# Altium PCB QSTL_THS3491_RGT_G20_RevC.PcbDoc
Units mil, origin at the board's own origin, x right, y up, seen from the top; angles counter-clockwise.
Board outline 1640 x 2700 mil, 4 copper layers (L1 Signal GND, L2 GND, L3 Split Power, L4 GND Thermal), stack 62.449 mil thick; 35 components, 15 nets, 84 pads, 643 vias.
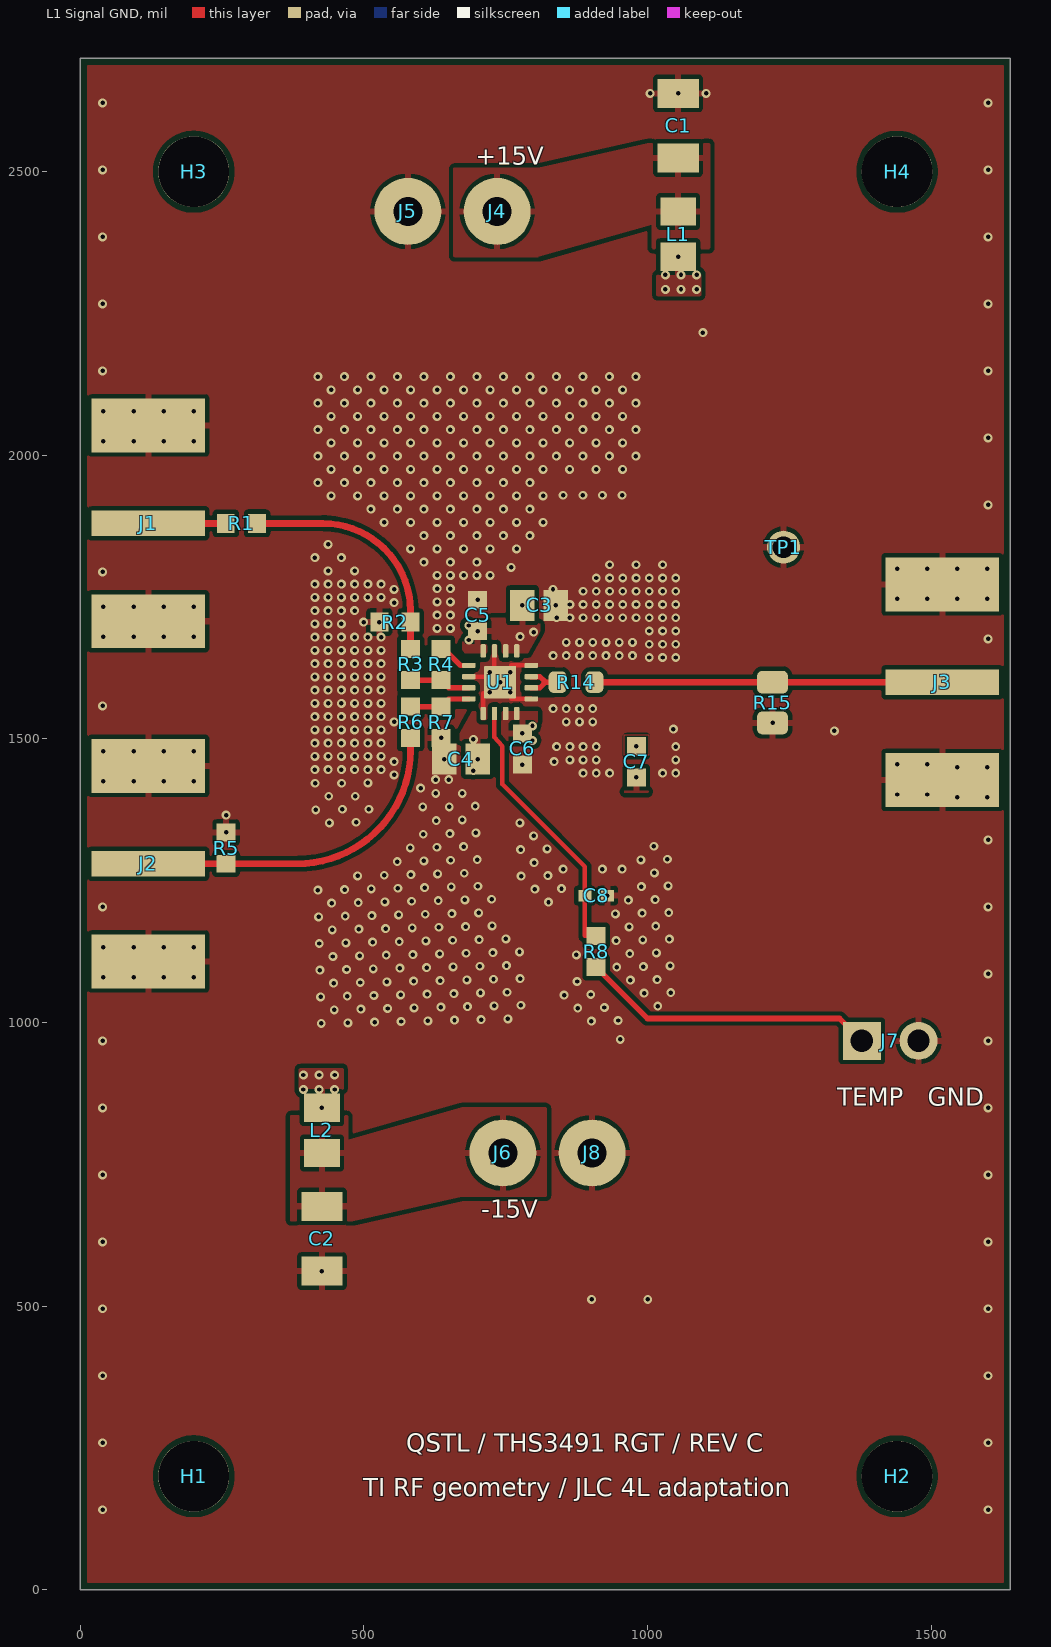
[diagram p0: L1 Signal GND view]
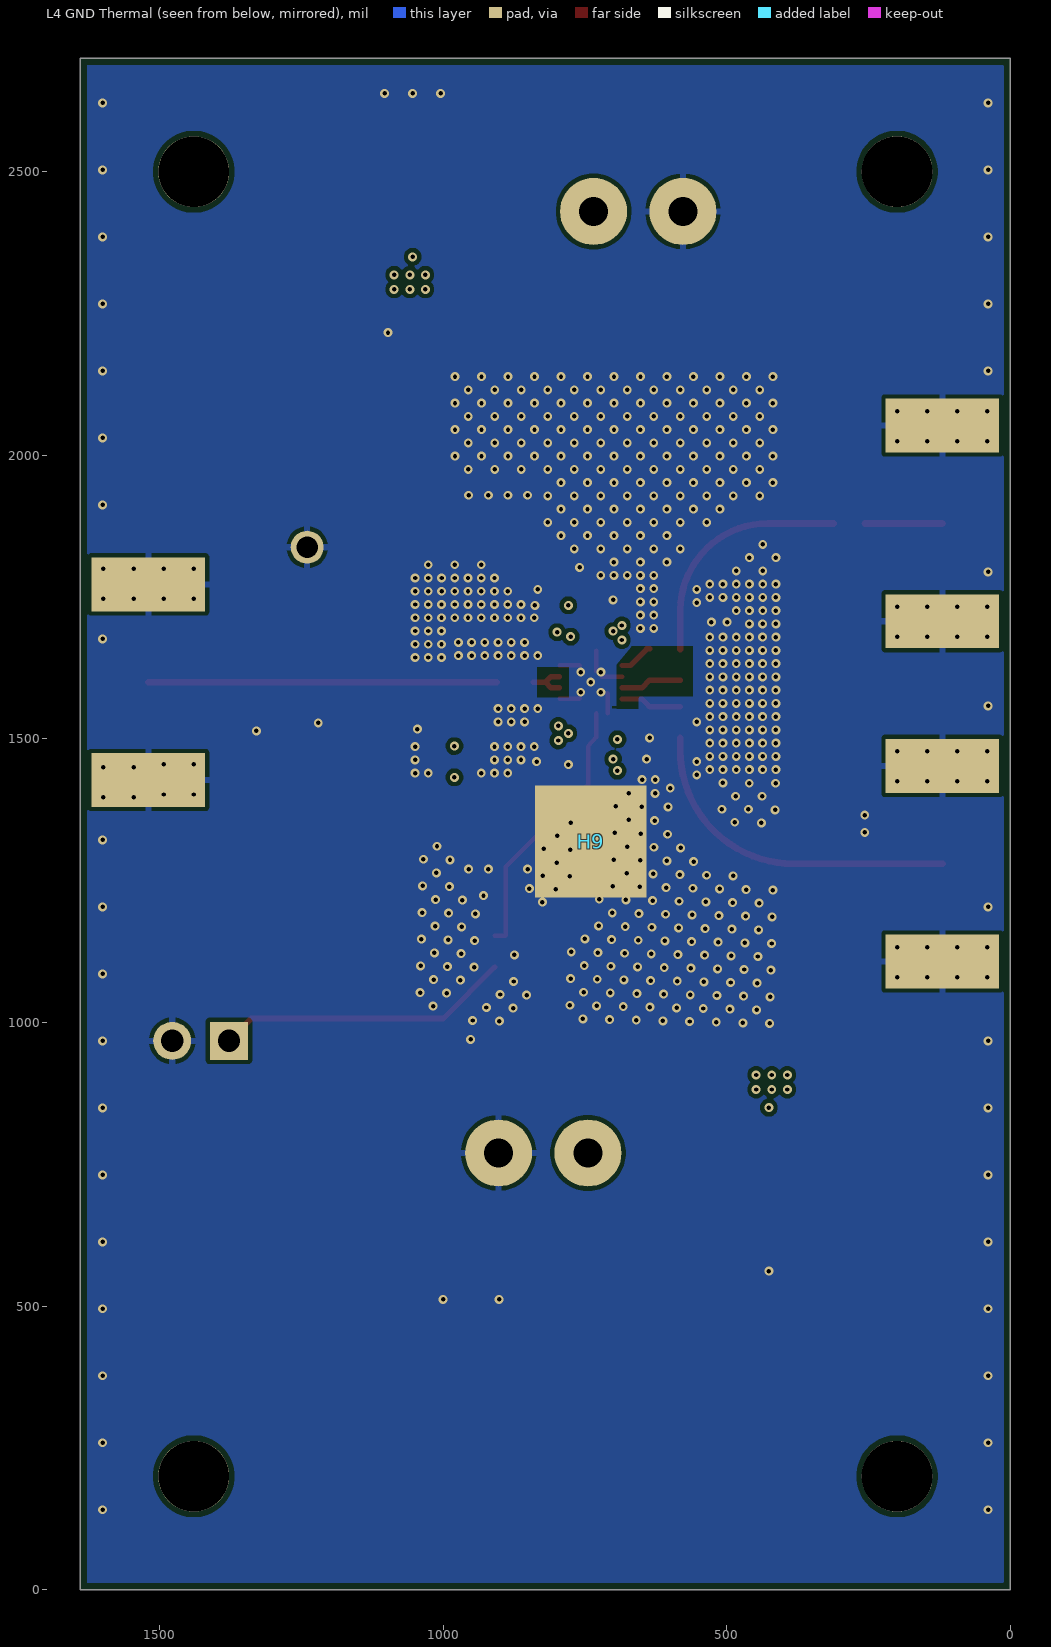
[diagram p1: L4 GND Thermal view, seen from below]
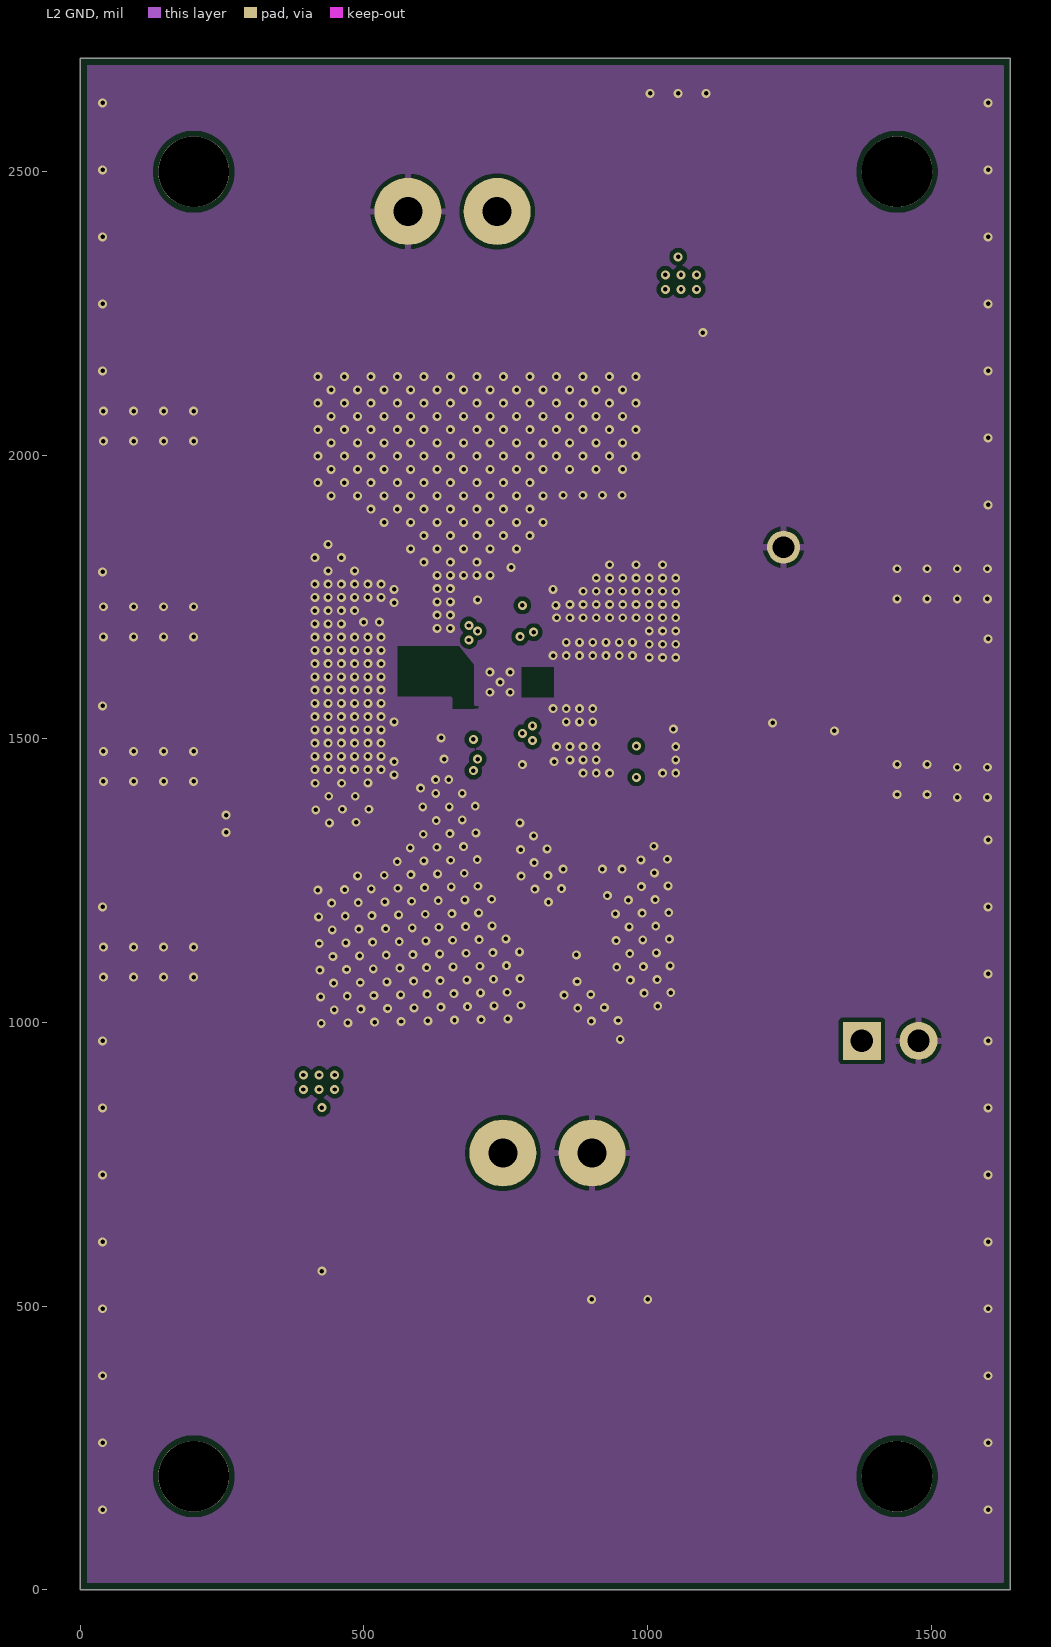
[diagram p2: L2 GND]
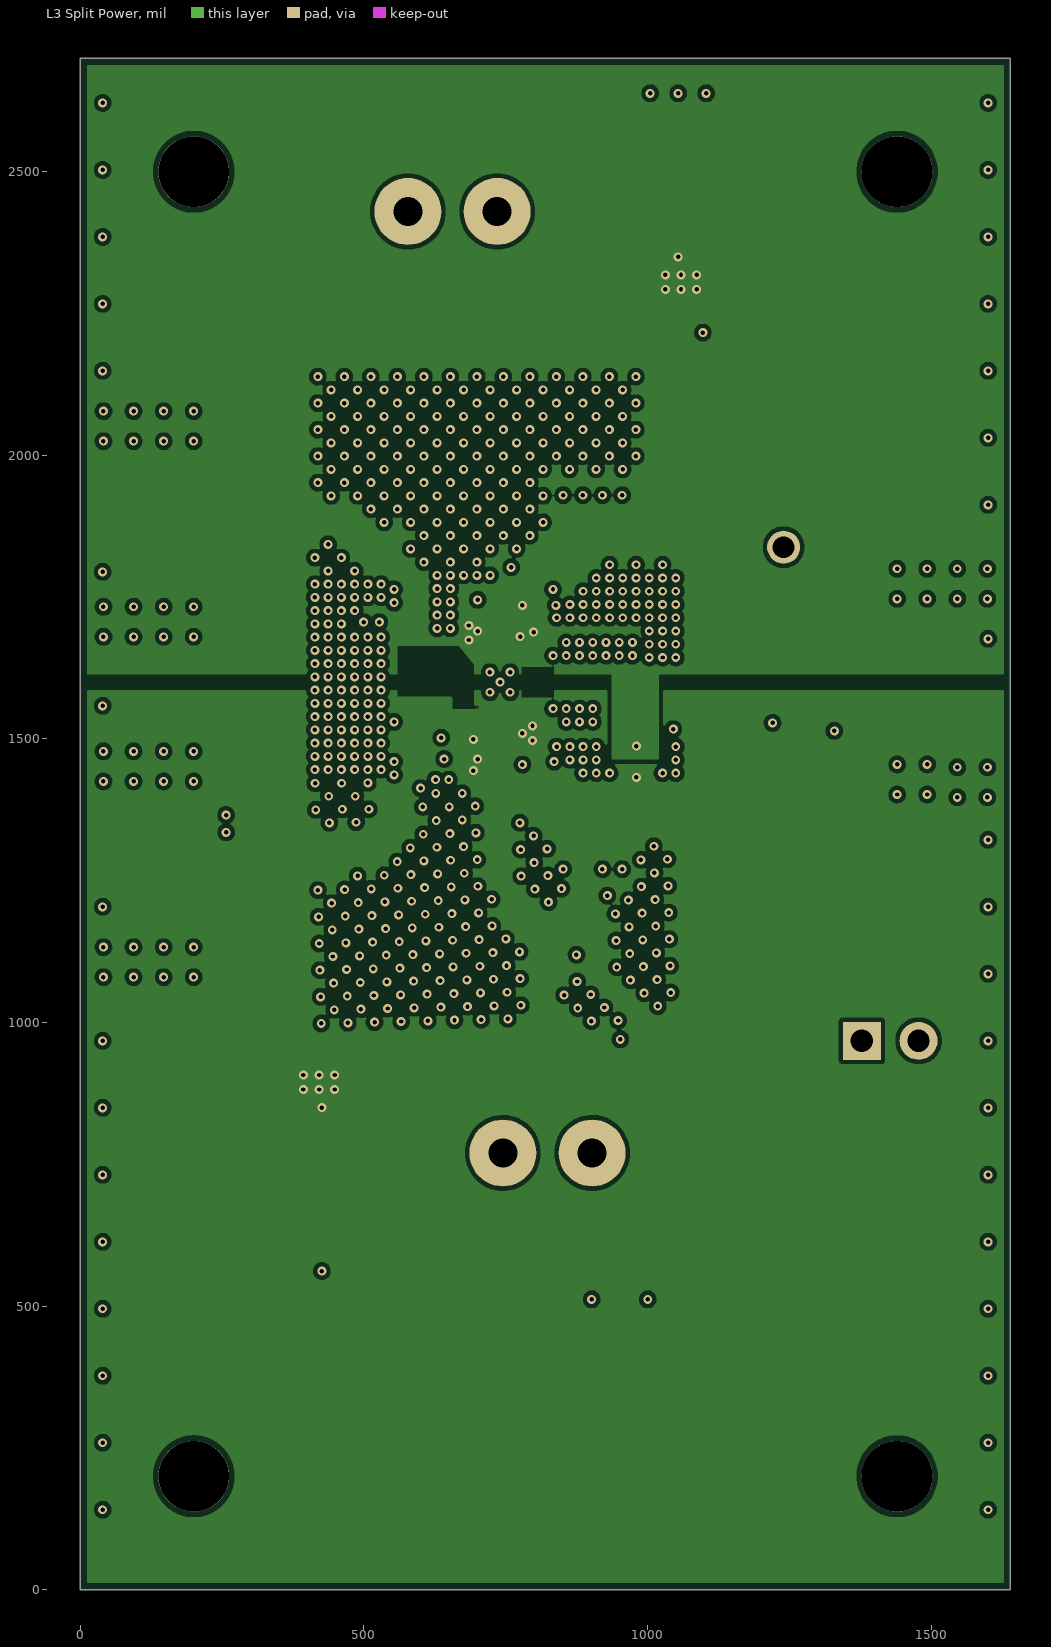
[diagram p3: L3 Split Power]

## Layer stack, top to bottom
Top Solder: solder mask 0.5984, Solder Resist, Dk 3.8
L1 Signal GND: signal copper 1.378
7628 Prepreg: dielectric 8.2835, FR4-7628, Dk 4.4
L2 GND: signal copper 0.5984
FR4 Core: core 41.9291, FR4, Dk 4.6
L3 Split Power: signal copper 0.5984
7628 Prepreg: dielectric 8.2835, FR4-7628, Dk 4.4
L4 GND Thermal: signal copper 1.378
Bottom Solder: solder mask 0.5984, Solder Resist, Dk 3.8

## Board outline
0,2700 1640,2700 1640,0 0,0

## Design rules (kind name [scope] priority, off if disabled: settings)
Clearance Copper_to_polygon_0p20 [InPolygon] p1: gap=7.87 ignorepadtopadclearanceinfootprint=FALSE
Clearance Copper_min_0p15 [All] p2: gap=5.91 ignorepadtopadclearanceinfootprint=FALSE
HoleSize Finished_drill [All] p1: absolutevalues=TRUE maxlimit=125.98 minlimit=7.87 maxpercent=80.000 minpercent=20.000
MinimumAnnularRing Annular_ring [All] p1: minimumring=5.91 minimum=3.94
PolygonConnect Direct_RF_thermal_vias [IsVia Or InComponent('U1') Or InComponent('H9') Or ((InComponent('C3') Or InComponent('C4') Or InComponent('C5') Or InComponent('C6')) And InNet('GND'))] p1: connectstyle=Direct reliefconductorwidth=10 reliefentries=4 polygonreliefangle="90 Angle" airgapwidth=9.02
PolygonConnect Pad_thermal_relief [Not (IsVia Or InComponent('U1') Or InComponent('H9') Or ((InComponent('C3') Or InComponent('C4') Or InComponent('C5') Or InComponent('C6')) And InNet('GND')))] p2: connectstyle=Relief reliefconductorwidth=9.84 reliefentries=4 polygonreliefangle="90 Angle" airgapwidth=7.87
SolderMaskExpansion Mask_expansion [All] p1: expansion=1.57 istentingtop=FALSE
Width Trace_width [All] p1: maxlimit=59.06 minlimit=5.91 preferedwidth=12.04
3 further rules are at their usual default settings.

## Components (designator, comment, footprint, x,y, rotation, side; value= is the part's Value field where it differs from the comment)
C1 "" 1206 1054,2581.09 r90 top
C2 "" 1206 426,618.91 r270 top
C3 "" 0805L 809.06,1735.43 r0 top
C4 "" 0805L 670.95,1464.57 r180 top
C5 "" 0603L 700.47,1717.72 r90 top
C6 "" 0603L 779.53,1482.28 r270 top
C7 "" 0603L 980.31,1459.84 r270 top
C8 "" 0402L 909.45,1223.62 r0 top
H1 "" B_F_PMSSS4400025PH 200,200 r0 top
H2 "" B_F_PMSSS4400025PH 1440,200 r0 top
H3 "" B_F_PMSSS4400025PH 200,2500 r0 top
H4 "" B_F_PMSSS4400025PH 1440,2500 r0 top
H9 "" Aavid_7109DG 740,1319.13 r180 bottom
J1 "" Emerson_142-0701-851 10,1880 r90 top
J2 "" Emerson_142-0701-851 10,1280 r90 top
J3 "" Emerson_142-0701-851 1630,1600 r270 top
J4 "" WIRE_PAD 735,2430 r0 top
J5 "" WIRE_PAD 577.52,2430 r0 top
J6 "" WIRE_PAD 745,770 r0 top
J7 "" PinHeader_1x02_P2.54mm_Vertical 1377.95,967.72 r90 top
J8 "" WIRE_PAD 902.48,770 r0 top
L1 "" 0805_HV 1054,2390 r270 top
L2 "" 0805_HV 426,810 r90 top
R1 "" 0603L 284,1880 r0 top
R2 "" 0603L 554.75,1706 r0 top
R3 "" 0603L 582.31,1631.24 r270 top
R4 "" 0603L 636.31,1631.24 r90 top
R5 "" 0603L 257,1307.56 r270 top
R6 "" 0603L 582.31,1529.39 r90 top
R7 "" 0603L 636.31,1529.39 r90 top
R8 "" 0603L 909.45,1125.2 r90 top
R14 "" R_0603_1608Metric 874.02,1600 r0 top
R15 "" R_0805_2012Metric 1220.47,1564.07 r270 top
TP1 "" CC_TP105-01-09 1240,1838 r0 top
U1 "" RGT0016A 740,1600 r0 top

## Footprints (in the part's own frame and the unit in brackets; to place one, negate y for a bottom-side part, rotate by r counter-clockwise, add the part's x,y. Pads: shape width x height; smd on the part's side, far side on the other; paste and mask are expansions set on the pad)
0402L [mm]
  rect 0.6x0.5 smd paste+0 mask+0.04: 1(-0.5,0) 2(0.5,0)
0603L [mm]
  rect 0.8x0.85 smd paste+0 mask+0.04: 1(-0.7,0) 2(0.7,0)
0805_HV [mil]
  rect 50x63 smd paste+0 mask+1.57: 1(-40,0) 2(40,0)
0805L [mm]
  rect 1.1x1.4 smd paste+0 mask+0.04: 1(-0.75,0) 2(0.75,0)
1206 [mm]
  rect 1.3x1.85 smd paste+0 mask+0.04: 1(-1.45,0) 2(1.45,0)
Aavid_7109DG [mm]
  rect 5x5 smd paste+0 mask+0.04: 1(0,0)
B_F_PMSSS4400025PH [mil]
  round 125 hole 125 unplated paste-393.7 mask+0: ""(0,0)
CC_TP105-01-09 [mil]
  round 58.19 hole 38.5 paste-393.7 mask+1.57: 1(0,0)
Emerson_142-0701-851 [mil]
  rect 45x200 smd paste+0 mask+1.57: 1(0,-110)
  rect 95x200 smd paste+0 mask+1.57: 2(-172.5,-110) 3(172.5,-110)
  rect 95x200 smd far side paste+0 mask+1.57: 4(172.5,-110) 5(-172.5,-110)
PinHeader_1x02_P2.54mm_Vertical [mm]
  rect 1.7x1.7 hole 1 paste-10 mask+0.04: 1(0,0)
  round 1.7 hole 1 paste-10 mask+0.04: 2(0,-2.54)
R_0603_1608Metric [mm]
  rrect50% 0.8x0.95 smd paste+0 mask+0.04: 1(-0.825,0) 2(0.825,0)
R_0805_2012Metric [mm]
  rrect49% 1.025x1.4 smd paste+0 mask+0.04: 1(-0.912,0) 2(0.913,0)
RGT0016A [mm]
  rrect42% 0.6x0.24 smd paste+0 mask+0.04: 1(-1.4,0.75) 2(-1.4,0.25) 3(-1.4,-0.25) 4(-1.4,-0.75) 9(1.4,-0.75) 10(1.4,-0.25) 11(1.4,0.25) 12(1.4,0.75)
  rrect42% 0.24x0.6 smd paste+0 mask+0.04: 5(-0.75,-1.4) 6(-0.25,-1.4) 7(0.25,-1.4) 8(0.75,-1.4) 13(0.75,1.4) 14(0.25,1.4) 15(-0.25,1.4) 16(-0.75,1.4)
  rrect7% 1.45x1.45 smd paste+0 mask+0.04: 17(0,0)
WIRE_PAD [mm]
  round 3 hole 1.3 paste-10 mask+0.04: 1(0,0)

## Part data
C1 C2: library part GRM319R61H475KA12D, "4.7u / 50V"
C3 C4: library part C2012X5R1H105KT000N, "1u / 50V"
C5 C6: library part CL10B104KB8NNNC, "100n / 50V X7R"
C7: library part 06031C103KAT2A, "10n / 100V"
C8: library part GRM155R61E104KA87D, "100n / 25V"
H1 H2 H3 H4: library part "PMSSS 440 0025 PH", "PMSSS 440 0025 PH"
H9: library part 7109DG, "7109DG"
J1: library part 142-0701-851, "SMA IN-"
J2: library part 142-0701-851, "SMA IN+"
J3: library part 142-0701-851, "SMA OUT"
J4: library part WIRE_SOLDER_PADS, "VIN_P"
J5 J8: library part GND, "GND"
J6: library part VIN_N, "VIN_N"
J7: library part GENERIC_1x02_2.54mm, "TEMP / GND"
L1 L2: library part BLM21PG221SN1D, "220R @100MHz"
R1 R7 R14: library part CRCW060349R9FKEA, "49.9"
R2 R6 R8: library part CRCW06030000Z0EA, "0"
R3: library part RC0603FR-0720R5L, "20.5"
R4: library part CRCW0603390RFKEAHP, "390"
R5: library part CRCW060349R9FKEA, "49.9 DNP"
R15: library part CRCW08051M00FKEA, "1Meg"
TP1: library part PCB_TEST_PAD, "GND"
U1: library part THS3491IRGTR, "THS3491IRGTR"

## Via types
v1: diameter 15.75, hole 7.87, L1 Signal GND to L4 GND Thermal, tented both sides, 643 vias

## Nets (pads, with @x,y where several pads share a name; then routed paths per layer and width w, separated by ;. In a path a pad name is that pad's centre, name@x,y a point inside that pad or via, vN(x,y) a via of type N, cw(c..) or ccw(c..) an arc to the next point about the centre after c; other vN are vias at no path point)
AMP_OUT: R14.1 U1.10 U1.11 | length 101
  L1 Signal GND w9.45: U1.10 810.09,1590.16 819.93,1600 ; U1.11 810.09,1609.84 819.93,1600 ; 819.93,1600 R14.1 819.93,1600
FB: R4.2 U1.1 | length 60.7
  L1 Signal GND w9.45: R4.2 641,1658.8 670.27,1629.53 U1.1
GND: C1.2 C2.2 C3.2 C4.2 C5.2 C6.2 C8.2 H9.1 J1.2 J1.3 J1.4 J1.5 J2.2 J2.3 J2.4 J2.5 J3.2 J3.3 J3.4 J3.5 J5.1 J7.2 J8.1 R2.1 R5.1 R7.1 R15.2 TP1.1 U1.2 U1.5 U1.9 U1.12 U1.15 U1.17 | length 177.2
  L1 Signal GND w7.87: U1.2 U1.17@720.32,1609.84 ; U1.5 710.47,1580.32 ; U1.17@730.16,1619.68 U1.15 ; 759.69,1570.47 U1.9 ; 759.69,1629.53 U1.12
  other v1: 39.37,140.94 1600.63,140.94 39.37,259.06 1600.63,259.06 39.37,377.17 1600.63,377.17 39.37,495.28 1600.63,495.28 901.58,511.83 1000.42,511.83 426,561.83 39.37,613.39 1600.63,613.39 39.37,731.5 1600.63,731.5 39.37,849.61 1600.63,849.61 39.37,967.72 1600.63,967.72 952,970.3 424.78,998.29 471.77,999.45 518.77,1000.6 565.77,1001.76 901.16,1002.41 612.77,1002.91 659.76,1004.07 948.16,1003.56 706.76,1005.23 753.76,1006.38 447.7,1022.37 494.69,1023.52 541.69,1024.68 877.09,1025.33 588.69,1025.84 924.08,1026.49 635.69,1026.99 682.68,1028.15 729.68,1029.3 1018.08,1028.8 776.68,1030.46 423.62,1045.29 470.62,1046.45 517.62,1047.6 853.01,1048.25 564.61,1048.76 900.01,1049.41 611.61,1049.91 658.61,1051.07 705.61,1052.22 994,1051.72 752.6,1053.38 1041,1052.87 446.54,1069.37 493.54,1070.52 540.54,1071.68 875.93,1072.33 587.53,1072.83 634.53,1073.99 681.53,1075.14 969.93,1074.64 728.53,1076.3 1016.92,1075.79 775.52,1077.46 40.81,1080 93.81,1080 146.81,1080 199.81,1080 1600.63,1085.83 422.46,1092.29 469.46,1093.44 516.46,1094.6 563.46,1095.75 610.45,1096.91 657.45,1098.07 945.85,1097.56 704.45,1099.22 992.85,1098.72 751.45,1100.38 1039.84,1099.87 445.39,1116.36 492.38,1117.52 539.38,1118.68 874.77,1119.32 586.38,1119.83 633.38,1120.99 680.37,1122.14 968.77,1121.64 727.37,1123.3 1015.77,1122.79 774.37,1124.45 40.81,1133 93.81,1133 146.81,1133 199.81,1133 421.31,1139.28 468.31,1140.44 515.3,1141.6 562.3,1142.75 609.3,1143.91 656.3,1145.06 944.69,1144.56 703.29,1146.22 991.69,1145.71 750.29,1147.38 1038.69,1146.87 444.23,1163.36 491.23,1164.52 538.22,1165.67 585.22,1166.83 632.22,1167.98 679.22,1169.14 967.61,1168.63 726.21,1170.3 1014.61,1169.79 420.15,1186.28 467.15,1187.44 514.15,1188.59 561.15,1189.75 608.14,1190.91 655.14,1192.06 943.54,1191.55 702.14,1193.22 990.53,1192.71 1037.53,1193.87 39.37,1203.94 1600.63,1203.94 443.07,1210.36 490.07,1211.51 825.47,1212.16 537.07,1212.67 584.07,1213.83 631.06,1214.98 678.06,1216.14 966.46,1215.63 725.06,1217.29 1013.46,1216.79 929.13,1223.62 419,1233.28 465.99,1234.44 801.39,1235.08 512.99,1235.59 848.39,1236.24 559.99,1236.75 606.99,1237.9 653.99,1239.06 700.98,1240.21 989.38,1239.71 1036.38,1240.86 777.31,1258.01 488.92,1258.51 824.31,1259.16 535.91,1259.67 582.91,1260.82 629.91,1261.98 676.91,1263.14 1012.3,1263.78 851.35,1270.33 920.61,1270.33 955.27,1270.33 800.23,1282.08 558.83,1283.74 605.83,1284.9 652.83,1286.06 699.83,1287.21 988.22,1286.71 1035.22,1287.86 776.16,1305 823.15,1306.16 581.75,1307.82 628.75,1308.98 675.75,1310.13 1011.14,1310.78 1600.63,1322.05 799.08,1329.08 604.68,1331.9 651.67,1333.05 697.52,1334.49 257,1335.12 439.16,1351.93 775,1352 486.15,1353.08 627.6,1355.97 673.44,1357.41 257,1365.83 415.08,1374.85 462.08,1376 508.8,1376 603.8,1380.05 650.52,1380.05 696.36,1381.49 1546.19,1397 1599.19,1397 438,1398.92 484.72,1398.92 1440.19,1402 1493.19,1402 626.72,1404.13 673.44,1404.13 599.85,1413.13 413.92,1421.84 460.64,1421.84 506.92,1422.56 40.81,1425 93.81,1425 146.81,1425 199.81,1425 626.28,1428.2 649.64,1428.2 553.13,1436.48 886.36,1439.64 909.72,1439.64 933.08,1439.64 1026.52,1439.64 1049.87,1439.64 413.48,1445.92 436.84,1445.92 460.2,1445.92 483.56,1445.92 506.92,1445.92 530.28,1445.92 1546.19,1450 1599.19,1450 779.53,1454.72 1440.19,1455 1493.19,1455 553.13,1459.84 835.44,1459.85 863,1463 886.36,1463 909.72,1463 1049.87,1463 641.42,1464.57 413.48,1469.28 436.84,1469.28 460.2,1469.28 483.56,1469.28 506.92,1469.28 530.28,1469.28 40.81,1478 93.81,1478 146.81,1478 199.81,1478 839.64,1486.36 863,1486.36 886.36,1486.36 909.72,1486.36 1049.87,1486.36 413.48,1492.64 436.84,1492.64 460.2,1492.64 483.56,1492.64 506.92,1492.64 530.28,1492.64 636.31,1501.83 1329.54,1514.17 413.48,1516 436.84,1516 460.2,1516 483.56,1516 506.92,1516 530.28,1516 1045.54,1517.32 1220.47,1528.15 553.13,1529.92 856.8,1529.92 880.15,1529.92 903.51,1529.92 413.48,1539.36 436.84,1539.36 460.2,1539.36 483.56,1539.36 506.92,1539.36 530.28,1539.36 833.44,1553.28 856.79,1553.28 880.15,1553.28 903.51,1553.28 39.37,1558.27 413.48,1562.72 436.84,1562.72 460.2,1562.72 483.56,1562.72 506.92,1562.72 530.28,1562.72 722.28,1582.28 757.72,1582.28 413.48,1586.08 436.84,1586.08 460.2,1586.08 483.56,1586.08 506.92,1586.08 530.28,1586.08 740,1600 413.48,1609.43 436.84,1609.43 460.2,1609.44 483.56,1609.44 506.92,1609.44 530.28,1609.44 722.28,1617.72 757.72,1617.72 413.48,1632.79 436.84,1632.79 460.2,1632.79 483.56,1632.8 506.92,1632.8 530.28,1632.8 1003.16,1643.57 1026.52,1643.57 1049.87,1643.57 833.44,1646.72 856.79,1646.72 880.15,1646.72 903.51,1646.72 926.87,1646.72 950.23,1646.72 973.59,1646.72 413.48,1656.15 436.84,1656.15 460.2,1656.15 483.56,1656.15 506.92,1656.15 530.28,1656.15 1003.16,1666.93 1026.52,1666.93 1049.87,1666.93 856.79,1670.08 880.15,1670.08 903.51,1670.08 926.87,1670.08 950.23,1670.08 973.59,1670.08 1600.63,1676.38 40.81,1680 93.81,1680 146.81,1680 199.81,1680 413.48,1679.51 436.84,1679.51 460.2,1679.51 483.56,1679.51 506.92,1679.51 530.28,1679.51 1003.16,1690.29 1026.52,1690.29 1049.87,1690.29 629,1695 652.36,1695 413.48,1702.87 436.84,1702.87 460.2,1702.87 499.63,1706 527.19,1706 839.64,1713.64 863,1713.64 886.36,1713.64 909.72,1713.64 933.08,1713.64 956.44,1713.64 979.8,1713.64 1003.16,1713.64 1026.51,1713.64 1049.87,1713.65 629,1718.36 652.36,1718.36 413.48,1726.23 436.84,1726.23 460.2,1726.23 483.56,1726.23 40.81,1733 93.81,1733 146.81,1733 199.81,1733 838.58,1735.43 863,1737 886.36,1737 909.72,1737 933.08,1737 956.44,1737 979.8,1737 1003.15,1737 1026.51,1737 1049.87,1737 553.13,1740.15 629,1741.72 652.36,1741.72 700.47,1745.28 1440.19,1747 1493.19,1747 1546.19,1747 1599.19,1747 413.48,1749.59 436.84,1749.59 460.2,1749.59 483.56,1749.59 506.92,1749.59 530.28,1749.59 886.36,1760.36 909.72,1760.36 933.08,1760.36 956.44,1760.36 979.79,1760.36 1003.15,1760.36 1026.51,1760.36 1049.87,1760.36 553.13,1763.51 833.43,1763.51 629,1765.08 652.36,1765.08 413.48,1772.95 436.84,1772.95 460.2,1772.95 483.56,1772.95 506.92,1772.95 530.28,1772.95 909.72,1783.72 933.08,1783.72 956.43,1783.72 979.79,1783.72 1003.15,1783.72 1026.51,1783.72 1049.87,1783.72 629,1788.44 652.36,1788.44 675.72,1788.44 699.08,1788.44 722.44,1788.44 39.37,1794.49 436.84,1796.31 483.56,1796.31 1440.19,1800 1493.19,1800 1546.19,1800 1599.19,1800 759.69,1802.49 933.08,1807.08 979.79,1807.08 1026.51,1807.08 605.64,1811.8 652.36,1811.8 699.08,1811.8 413.48,1819.67 460.2,1819.67 582.28,1835.16 629,1835.16 675.72,1835.16 722.44,1835.16 769.16,1835.16 436.84,1843.03 605.64,1858.52 652.36,1858.52 699.08,1858.52 745.8,1858.52 792.52,1858.52 535.56,1881.88 582.28,1881.88 629,1881.88 675.71,1881.88 722.43,1881.88 769.15,1881.88 815.87,1881.88 512.2,1905.24 558.92,1905.24 605.64,1905.24 652.35,1905.24 699.07,1905.24 745.79,1905.24 792.51,1905.24 1600.63,1912.6 442.12,1928.59 488.83,1928.59 535.56,1928.59 582.28,1928.6 629,1928.6 675.71,1928.6 722.43,1928.6 769.15,1928.6 815.87,1928.6 851.35,1929.67 886.01,1929.67 920.61,1929.67 955.27,1929.67 418.75,1951.95 465.47,1951.95 512.19,1951.95 558.91,1951.95 605.63,1951.96 652.35,1951.96 699.07,1951.96 745.79,1951.96 792.51,1951.96 442.11,1975.31 488.83,1975.31 535.55,1975.31 582.27,1975.32 628.99,1975.32 675.71,1975.32 722.43,1975.32 769.15,1975.32 815.87,1975.32 862.59,1975.32 909.31,1975.32 956.03,1975.32 418.75,1998.67 465.47,1998.67 512.19,1998.67 558.91,1998.67 605.63,1998.68 652.35,1998.68 699.07,1998.68 745.79,1998.68 792.51,1998.68 839.23,1998.68 885.95,1998.68 932.67,1998.68 979.39,1998.68 442.11,2022.03 488.83,2022.03 535.55,2022.03 582.27,2022.04 628.99,2022.04 675.71,2022.04 722.43,2022.04 769.15,2022.04 815.87,2022.04 862.59,2022.04 909.31,2022.04 956.03,2022.04 40.81,2025 93.81,2025 146.81,2025 199.81,2025 1600.63,2030.71 418.75,2045.39 465.47,2045.39 512.19,2045.39 558.91,2045.39 605.63,2045.4 652.35,2045.4 699.07,2045.4 745.79,2045.4 792.51,2045.4 839.23,2045.4 885.95,2045.4 932.67,2045.4 979.39,2045.4 442.11,2068.75 488.83,2068.75 535.55,2068.75 582.27,2068.76 628.99,2068.76 675.71,2068.76 722.43,2068.76 769.15,2068.76 815.87,2068.76 862.59,2068.76 909.31,2068.76 956.03,2068.76 40.81,2078 93.81,2078 146.81,2078 199.81,2078 418.75,2092.11 465.47,2092.11 512.19,2092.11 558.91,2092.11 605.63,2092.12 652.35,2092.12 699.07,2092.12 745.79,2092.12 792.51,2092.12 839.23,2092.12 885.95,2092.12 932.67,2092.12 979.39,2092.12 442.11,2115.47 488.83,2115.47 535.55,2115.47 582.27,2115.48 628.99,2115.48 675.71,2115.48 722.43,2115.48 769.15,2115.48 815.87,2115.48 862.59,2115.48 909.31,2115.48 956.03,2115.48 418.75,2138.83 465.47,2138.83 512.19,2138.83 558.91,2138.83 605.63,2138.84 652.35,2138.84 699.07,2138.84 745.79,2138.84 792.51,2138.84 839.23,2138.84 885.95,2138.84 932.67,2138.84 979.39,2138.84 39.37,2148.82 1600.63,2148.82 1097.53,2216.32 39.37,2266.93 1600.63,2266.93 39.37,2385.04 1600.63,2385.04 39.37,2503.15 1600.63,2503.15 39.37,2621.26 1600.63,2621.26 1004.58,2638.17 1054,2638.17 1103.42,2638.17
inm: J1.1 R1.1 | length 136.4
  L1 Signal GND w12.04: J1.1 R1.1
inpt: R6.2 R7.2 U1.4 | length 108.2
  L1 Signal GND w9.45: R7.2 649.83,1570.47 U1.4
  L1 Signal GND w10: R6.2 R7.2
inpt_raw: J2.1 R5.2 R6.1 | length 598.3
  L1 Signal GND w12.04: J2.1 382.3,1280 ccw(c382.3,1480) 582.3,1479.59 R6.1
INV: R3.2 R4.1 U1.3 | length 108.2
  L1 Signal GND w9.45: R4.1 649.83,1590.16 U1.3
  L1 Signal GND w10: R3.2 R4.1
output: J3.1 R14.2 R15.1 | length 613.5
  L1 Signal GND w12.04: R14.2 R15.1 J3.1
RG_DRIVE: R1.2 R2.2 R3.1 | length 425.8
  L1 Signal GND w12.04: R1.2 427.66,1880 ; 427.31,1880 cw(c427.27,1683.16) 427.66,1880 ; R3.1 R2.2 582.31,1727.38 ccw(c427.31,1725) 427.66,1880
TEMP: J7.1 R8.1 | length 522.3
  L1 Signal GND w9.84: R8.1 1000,1007.09 1338.58,1007.09 J7.1
TJ_RAW: C8.1 R8.2 U1.6 | length 477.4
  L1 Signal GND w7.87: U1.6 730.16,1503.15 744.09,1487.4 744.09,1420.47 889.76,1274.8 C8.1 889.76,1152.76 R8.2
VCC: C3.1 C5.1 C7.1 L1.2 U1.13 U1.14 U1.16
  other v1: 980.32,1487.4 685.04,1674.41 775.59,1680.32 799.21,1688.19 700.47,1690.16 685.04,1700 779.53,1735.43 1031.5,2292.52 1059.06,2292.52 1086.61,2292.52 1031.5,2318.11 1059.06,2318.11 1086.61,2318.11 1054,2350
VEE: C4.1 C6.1 C7.2 L2.2 U1.7 U1.8
  other v1: 426,850 393.39,881.89 420.95,881.89 448.5,881.89 393.39,907.48 420.95,907.48 448.5,907.48 980.32,1432.28 692.91,1444.09 700.47,1464.57 797.24,1497.24 692.91,1499.21 779.53,1509.84 797.24,1522.83
VIN_N: C2.1 J6.1 L2.1
VIN_P: C1.1 J4.1 L1.1
pads on no net: H1. H2. H3. H4.

## Polygon pours and split planes (outlines as drawn)
VEE on L1 Signal GND "L1_C7_VEE" (solid, remove dead copper, pour order 1): 958.66,1448.03 1001.97,1448.03 1001.97,1404.72 958.66,1404.72
VCC on L1 Signal GND "L1_C7_VCC" (solid, remove dead copper, pour order 2): 958.66,1507.09 1001.97,1507.09 1001.97,1471.65 958.66,1471.65
VEE on L1 Signal GND "L1_VEE_ENTRY_VIA_ISLAND" (solid, remove dead copper, pour order 3): 464.25,824.8 385.51,824.8 385.51,919.29 464.25,919.29
VCC on L1 Signal GND "L1_VCC_ENTRY_VIA_ISLAND" (solid, remove dead copper, pour order 4): 1015.75,2375.2 1094.49,2375.2 1094.49,2280.71 1015.75,2280.71
VCC on L1 Signal GND "L1_VCC_LOCAL_PIN_ISLAND" (solid, remove dead copper, pour order 5): 673.23,1713.78 748.03,1713.78 748.03,1766.93 811.02,1766.93 811.02,1690.16 789.37,1650.79 673.23,1650.79
VEE on L1 Signal GND "L1_VEE_LOCAL_PIN_ISLAND" (solid, remove dead copper, pour order 6): 806.77,1486.22 731.97,1486.22 731.97,1433.07 668.98,1433.07 668.98,1509.84 690.63,1549.21 806.77,1549.21
VIN_P on L1 Signal GND "L1_POSITIVE_INPUT" (solid, remove dead copper, pour order 7): 657.48,2507.09 807.09,2507.09 1000,2550.39 1110.24,2550.39 1110.24,2363.39 1007.87,2363.39 1007.87,2406.69 807.09,2349.61 657.48,2349.61
VIN_N on L1 Signal GND "L1_NEGATIVE_INPUT" (solid, remove dead copper, pour order 8): 822.52,692.91 672.91,692.91 480,649.61 369.76,649.61 369.76,836.61 472.13,836.61 472.13,793.31 672.91,850.39 822.52,850.39
VCC on L3 Split Power "L3_VCC" (solid, remove dead copper, pour order 9): 11.81,2688.19 1628.19,2688.19 1628.19,1613.78 1019.69,1613.78 1019.69,1463.78 937.01,1463.78 937.01,1613.78 11.81,1613.78
GND on L1 Signal GND "GND_REFERENCE" (solid, remove dead copper, pour order 10): 11.81,2688.19 1628.19,2688.19 1628.19,11.81 11.81,11.81
GND on L4 GND Thermal "GND_REFERENCE" (solid, remove dead copper, pour order 11): 11.81,2688.19 1628.19,2688.19 1628.19,11.81 11.81,11.81
GND on L2 GND "GND_REFERENCE" (solid, remove dead copper, pour order 12): 11.81,2688.19 1628.19,2688.19 1628.19,11.81 11.81,11.81
VEE on L3 Split Power "L3_VEE" (solid, remove dead copper, pour order 13): 11.81,1586.22 1628.19,1586.22 1628.19,11.81 11.81,11.81

## Silkscreen, mask and mechanical layers (free items; w line width, h text height)
Top Overlay:
  text "+15V" at 697.21,2512.68 h31.5
  text "TEMP   GND" at 1334.65,853.54 h31.5
  text "-15V" at 707.21,655.83 h31.5
  text "QSTL / THS3491 RGT / REV C" at 574.33,243.31 h31.5
  text "TI RF geometry / JLC 4L adaptation" at 498.74,164.57 h31.5
Mechanical 1:
  the board outline again, w1.97